# Altium PCB board.PcbDoc (part 1 of 3)
Units mm, origin at the board's own origin, x right, y up, seen from the top; angles counter-clockwise.
Board outline 86 x 120 mm, 4 copper layers (Top Layer, Signal Layer 1, Signal Layer 2, Bottom Layer), stack 1.571 mm thick; 144 components, 93 nets, 930 pads, 372 vias.
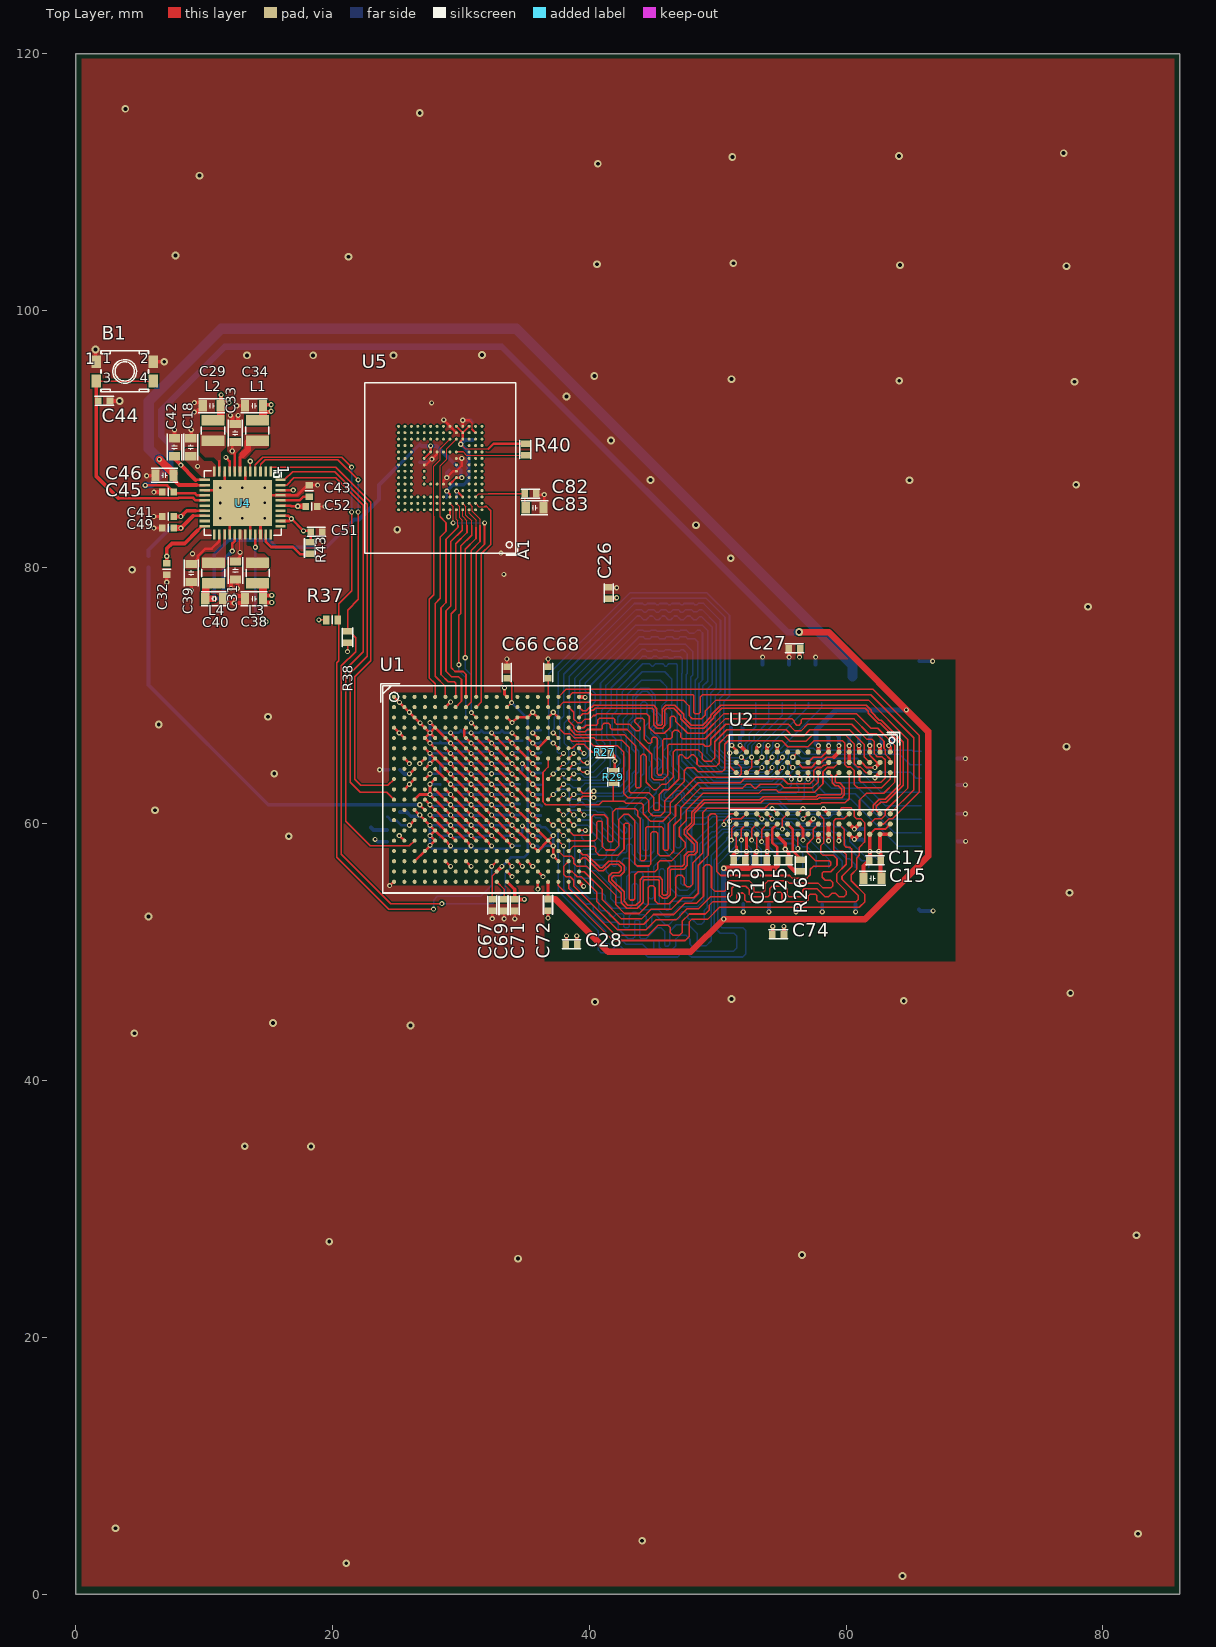
[diagram p0: Top Layer view]
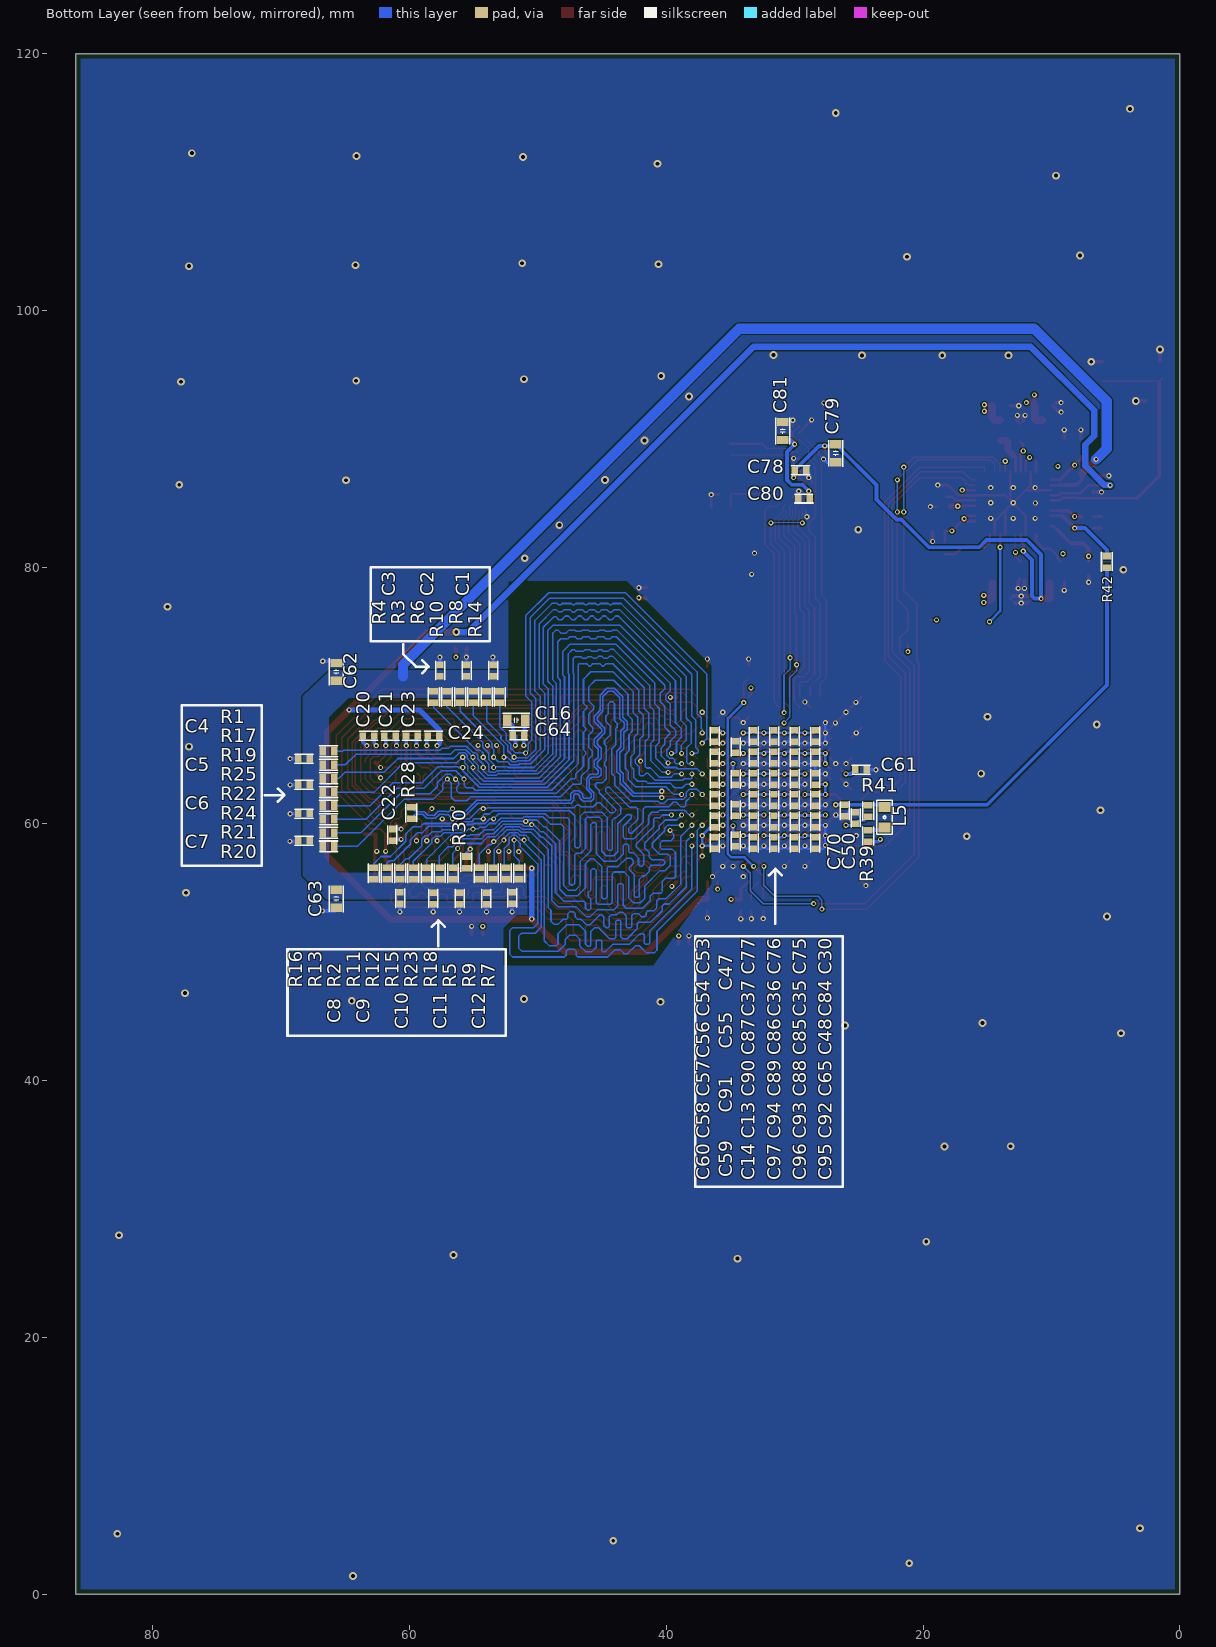
[diagram p1: Bottom Layer view, seen from below]
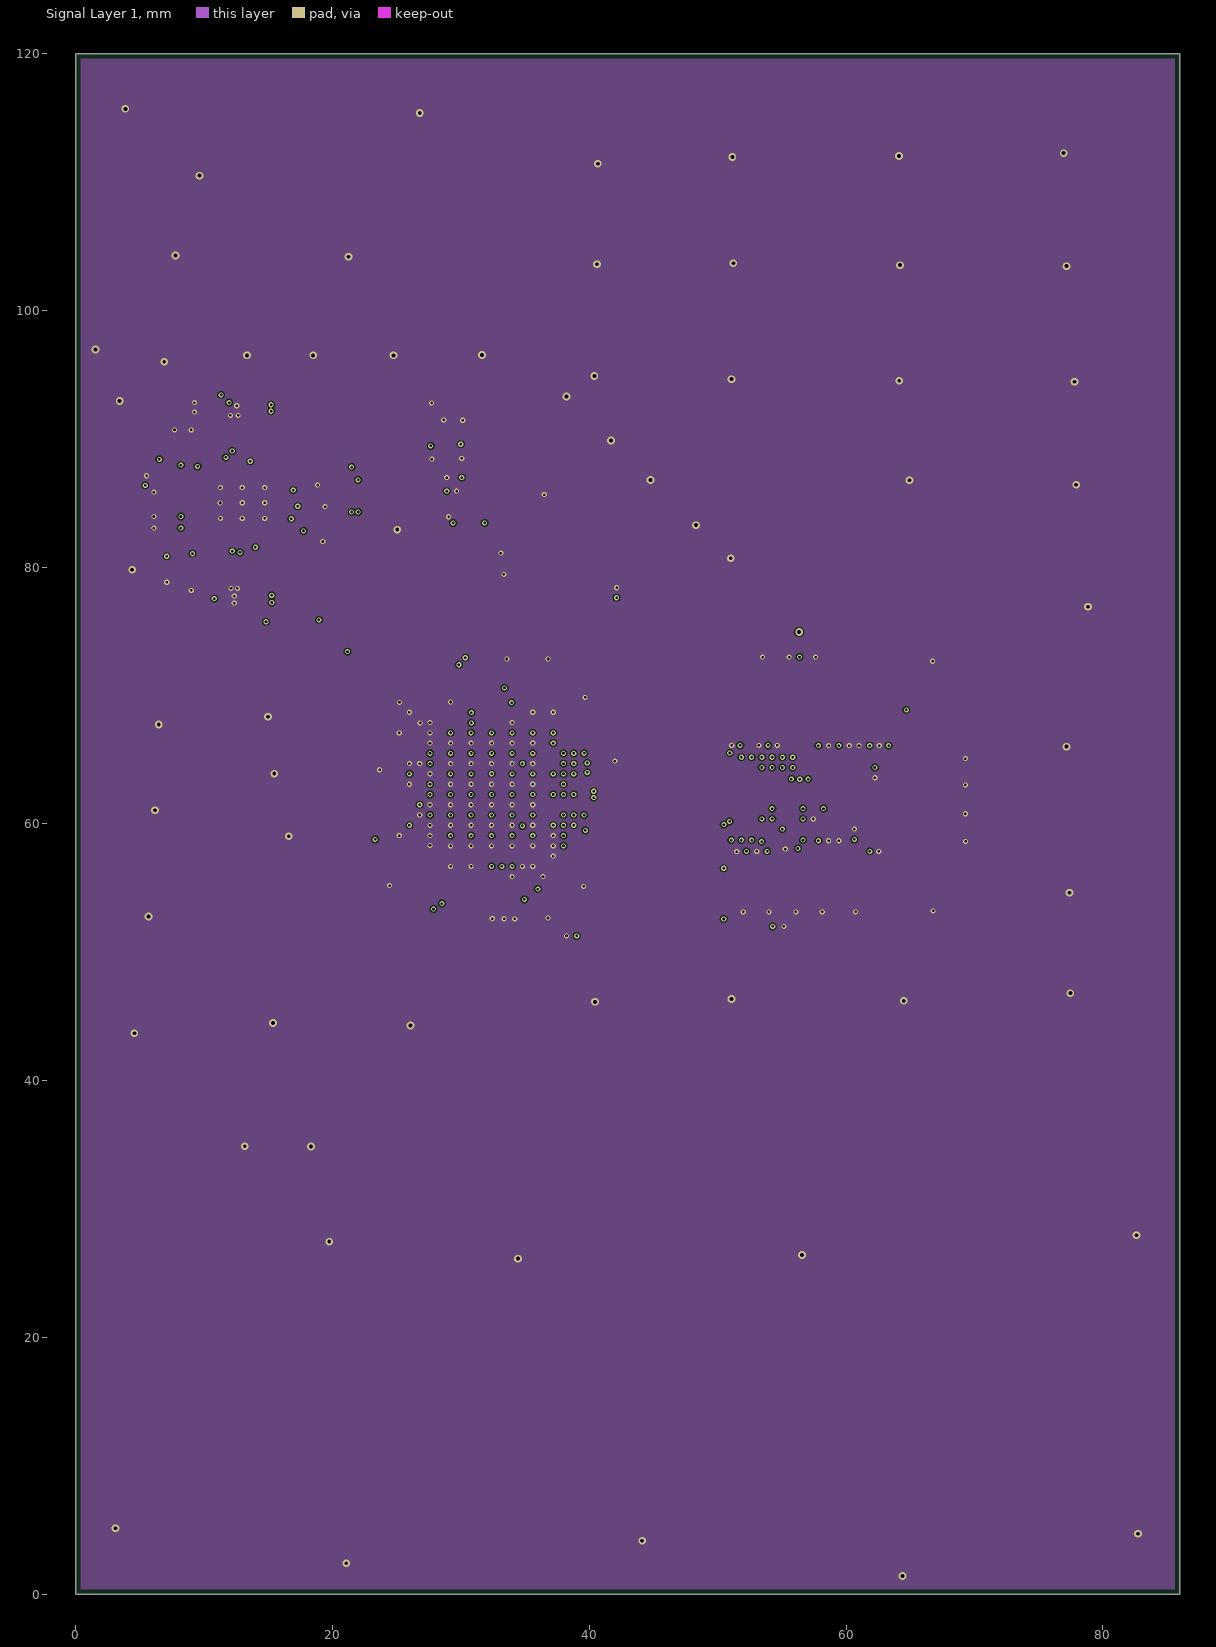
[diagram p2: Signal Layer 1]
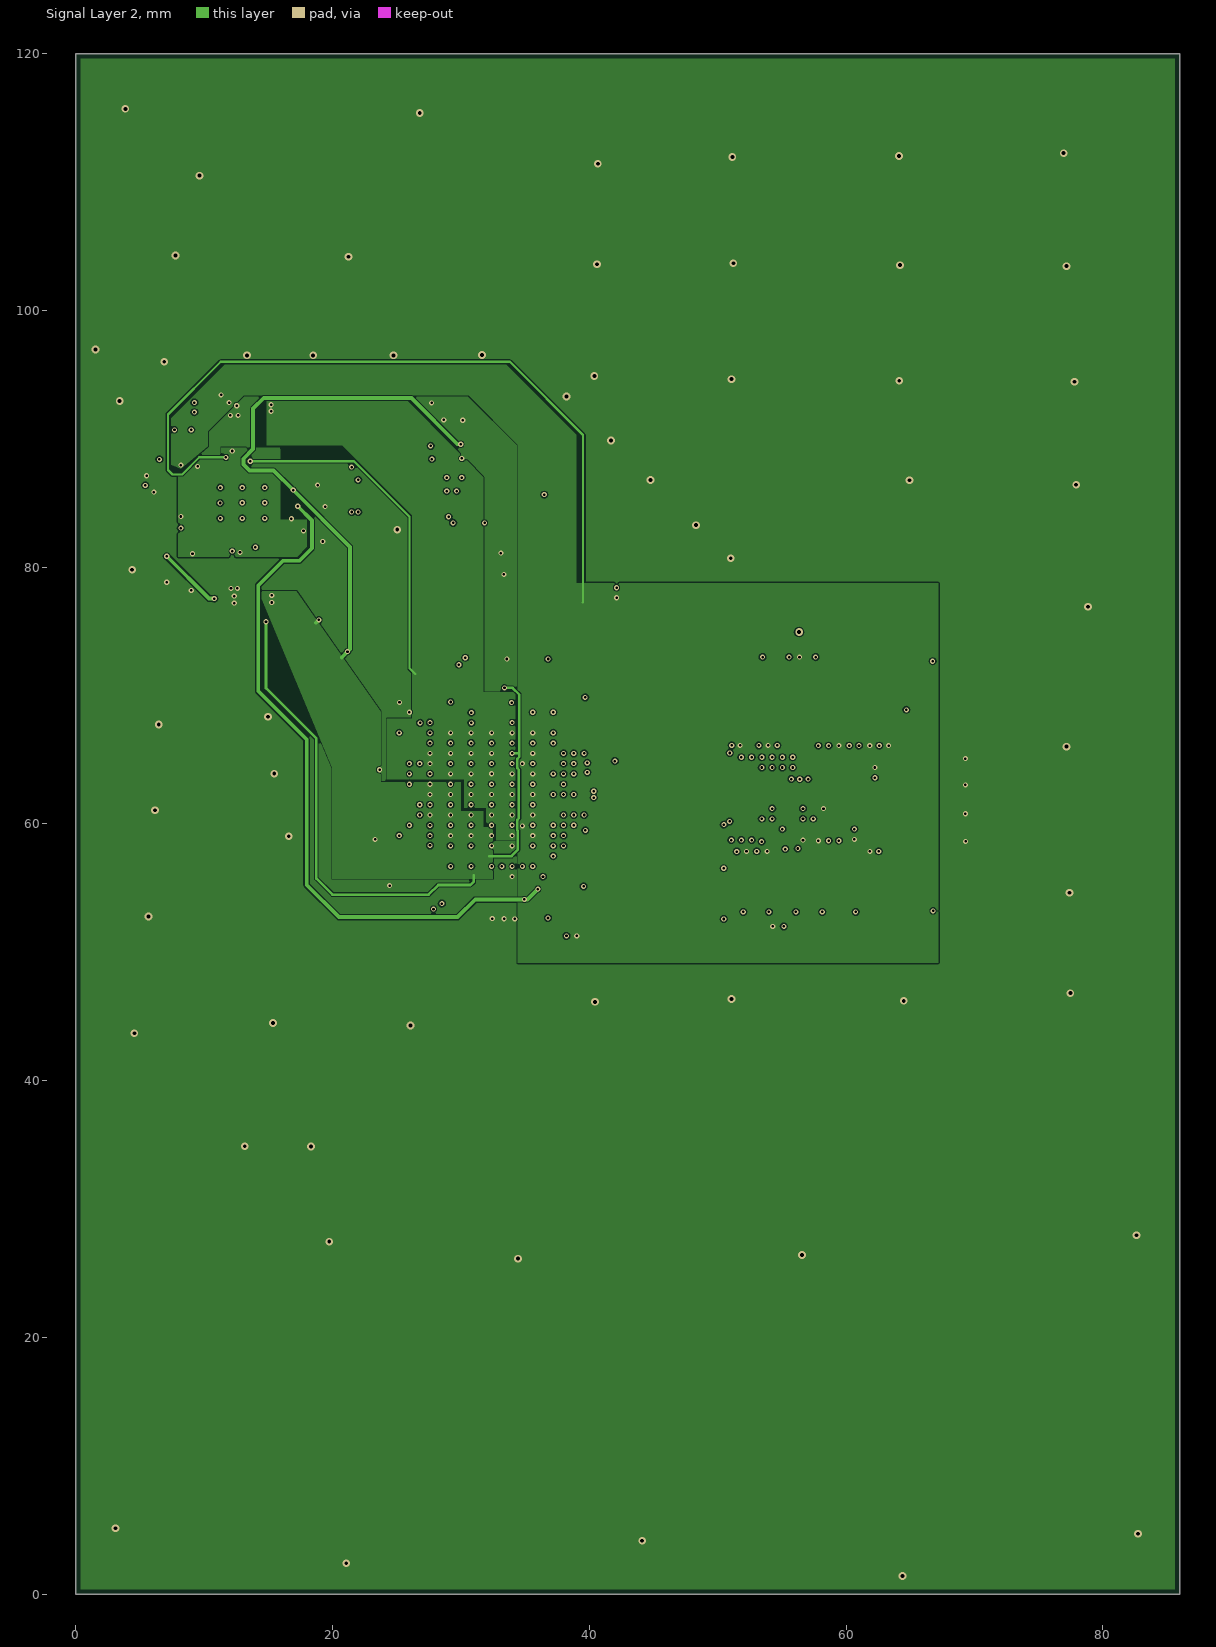
[diagram p3: Signal Layer 2]
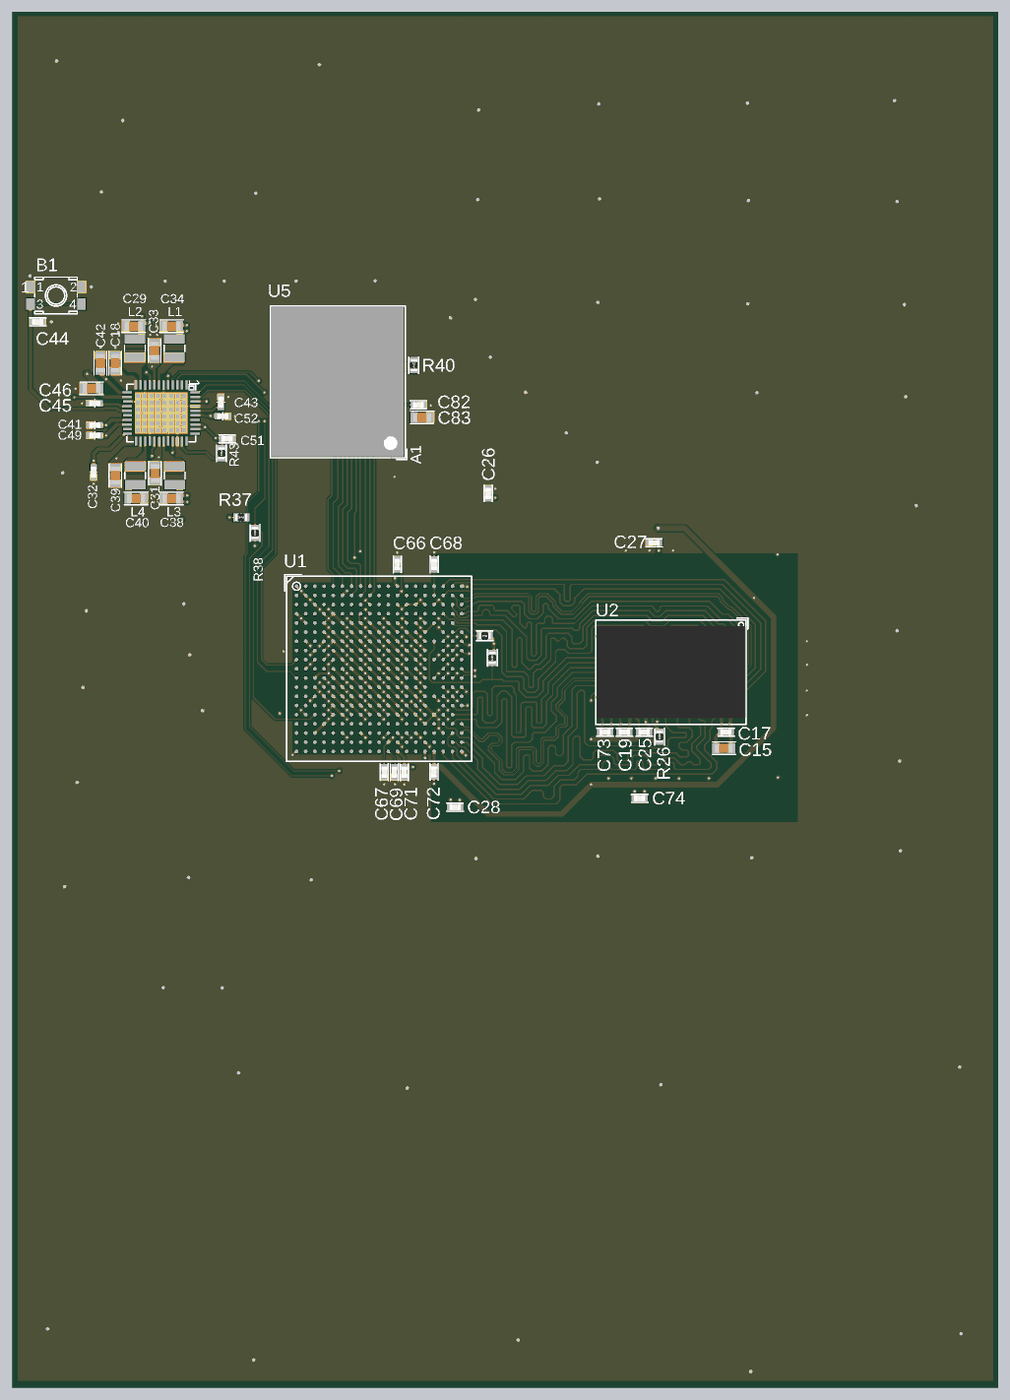
[diagram p6: 3D render of the assembled board from above, using the file's embedded part models]
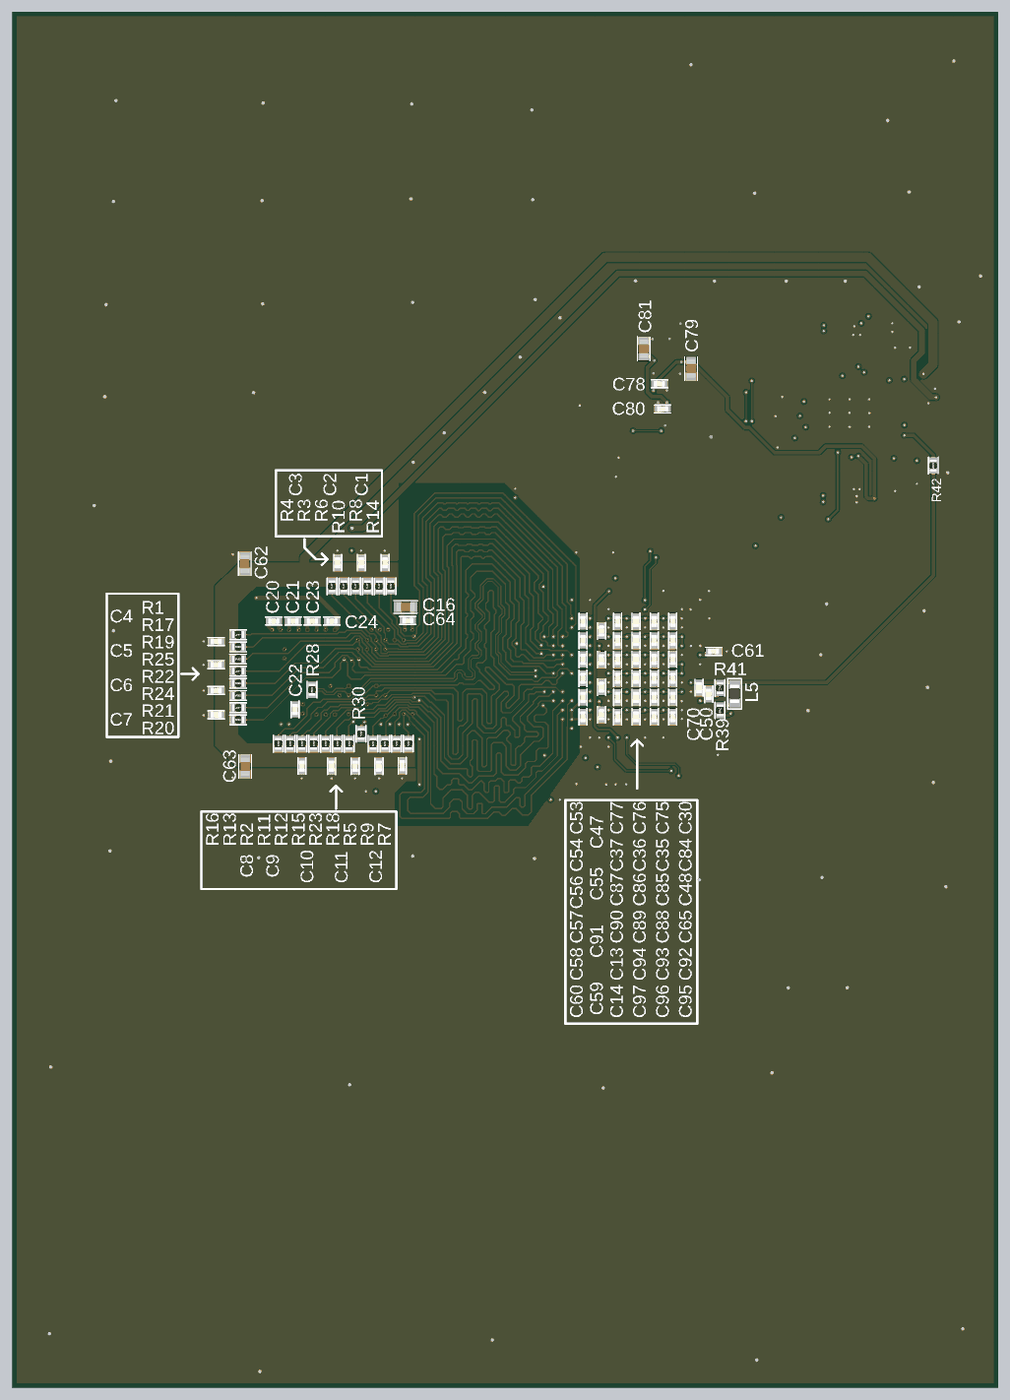
[diagram p7: 3D render of the assembled board from below, using the file's embedded part models]

## Layer stack, top to bottom
Top Solder: solder mask 0.0203, Solder Resist, Dk 3.5
Top Layer: signal copper 0.037
Dielectric 1: core 0.0986, FR-4, Dk 4.1
Signal Layer 1: signal copper 0.035
Dielectric 2: prepreg 1.23, FR-4, Dk 4.25
Signal Layer 2: signal copper 0.035
Dielectric 3: core 0.0986, FR-4, Dk 4.1
Bottom Layer: signal copper 0.037
Bottom Solder: solder mask 0.0203, Solder Resist, Dk 3.5

## Board outline
0,0 0,120 86,120 86,0

## Design rules (kind name [scope] priority, off if disabled: settings)
BoardOutlineClearance [All] p1: gap=0.4 ignorepadtopadclearanceinfootprint=FALSE
Clearance diff [InNetClass('diff')] p1: gap=0.1 ignorepadtopadclearanceinfootprint=FALSE except(0: Arc-Hole Track-Hole SMDPad-Hole THPad-Hole Via-Hole Fill-Hole Poly-Hole Region-Hole Text-Hole; 0.08: Track-SMDPad; 0.13: Track-Track; 0.15: Arc-Fill Track-Fill SMDPad-Fill THPad-Fill Via-Fill Fill-Fill; 0.2: Arc-THPad SMDPad-SMDPad SMDPad-THPad THPad-THPad)
Clearance [InNetClass('All Nets')] p2: gap=0.1 ignorepadtopadclearanceinfootprint=FALSE except(0: Arc-Hole Track-Hole SMDPad-Hole THPad-Hole Via-Hole Fill-Hole Poly-Hole Region-Hole Text-Hole; 0.09: Track-SMDPad; 0.15: Arc-Fill Track-Fill SMDPad-Fill THPad-Fill Via-Fill Fill-Fill)
ComponentClearance [All] p1 off: gap=0.025 collisioncheckmode=3 verticalgap=2540 showdistances=TRUE
DiffPairsRouting [All] p1: maxlimit=0.13 minlimit=0.13 mostfreqgap=0.13 toplayer_minwidth=0.09 toplayer_maxwidth=0.13 toplayer_prefwidth=0.1 midlayer1_minwidth=0.09 midlayer1_maxwidth=0.13 midlayer1_prefwidth=0.1 midlayer2_minwidth=0.09 midlayer2_maxwidth=0.13 midlayer2_prefwidth=0.1 bottomlayer_minwidth=0.09 bottomlayer_maxwidth=0.13 bottomlayer_prefwidth=0.1 maxuncoupledlength=0.5
FanoutControl Fanout_BGA [IsBGA] p1: bgadir=Out bgaviamode=Closest fanoutstyle=Auto fanoutdirection=Alternating viagrid=0.025 // Fanout_BGA (Default Rule)
FanoutControl Fanout_LCC [IsLCC] p2: bgadir=Out bgaviamode=Closest fanoutstyle=Auto fanoutdirection=Alternating viagrid=0.025 // Fanout_LCC (Default Rule)
FanoutControl Fanout_SOIC [IsSOIC] p3: bgadir=Out bgaviamode=Closest fanoutstyle=Auto fanoutdirection=Alternating viagrid=0.025 // Fanout_SOIC (Default Rule)
FanoutControl Fanout_Small [(CompPinCount < 5)] p4: bgadir=Out bgaviamode=Closest fanoutstyle=Auto fanoutdirection=OutThenIn viagrid=0.025 // Fanout_Small (Default Rule)
FanoutControl Fanout_Default [All] p5: bgadir=Out bgaviamode=Closest fanoutstyle=Auto fanoutdirection=Alternating viagrid=0.025 // Fanout_Default (Default Rule)
Height [All] p1 off: minheight=0 maxheight=100 prefheight=0.5
HoleSize [All] p1: absolutevalues=TRUE maxlimit=10 minlimit=0.15 maxpercent=80.000 minpercent=20.000
HoleToHoleClearance [All] p1: gap=0.25 allowstackedmicrovias=TRUE
Length Length_SDMMC1 [InNetClass('NETC_SDMMC1')] p1: maxlimit=86 minlimit=81
MinimumSolderMaskSliver [All] p1: minsoldermaskwidth=0
PlaneClearance [All] p1: clearance=0.6
PlaneConnect [All] p1: planeconnectstyle=Direct reliefexpansion=0.508 reliefentries=4 reliefconductorwidth=0.254 reliefairgap=0.254
PolygonConnect [All] p1: connectstyle=Direct reliefconductorwidth=0.254 reliefentries=4 polygonreliefangle="90 Angle" airgapwidth=0.254
RoomDefinition U_STM32_MPU_IOs [InComponentClass('U_STM32_MPU_IOs')] p1 off: confinementstyle=ConfineIn formatcopy=TRUE lockcomponents=FALSE outline 104.55,11.05 155.35,11.05 155.35,36.45 104.55,36.45
RoomDefinition U_Power_MPU [InComponentClass('U_Power_MPU')] p2 off: confinementstyle=ConfineIn formatcopy=TRUE lockcomponents=FALSE outline 87.674,18.025 101.45,18.025 101.45,24 87.674,24
RoomDefinition U_eMMC [InComponentClass('U_eMMC')] p3 off: confinementstyle=ConfineIn formatcopy=TRUE lockcomponents=FALSE outline 87.122,1.416 129.449,1.416 129.449,15.666 87.122,15.666
RoomDefinition U_1DDR3L_16bits [InComponentClass('U_1DDR3L_16bits')] p4 off: confinementstyle=ConfineIn formatcopy=TRUE lockcomponents=FALSE outline 92.5,18.4 143.3,18.4 143.3,43.8 92.5,43.8
RoomDefinition U_Power_PMIC [InComponentClass('U_Power_PMIC')] p5 off: confinementstyle=ConfineIn formatcopy=TRUE lockcomponents=FALSE outline 87.122,8.666 203.578,8.666 203.578,17.666 87.122,17.666
RoutingVias RoutingVias_GND [InNetClass('GND')] p1: holewidth=0.3 width=0.6 viastyle="Through Hole" minholewidth=0.2 minwidth=0.4 maxholewidth=0.3 maxwidth=0.6
RoutingVias RoutingVias_ALIMS [InNetClass('ALIMS')] p2: holewidth=0.3 width=0.6 viastyle="Through Hole" minholewidth=0.2 minwidth=0.4 maxholewidth=0.3 maxwidth=0.6
RoutingVias [All] p3: holewidth=0.2 width=0.4 viastyle="Through Hole" minholewidth=0.2 minwidth=0.4 maxholewidth=0.3 maxwidth=0.6
SilkToSilkClearance [All] p1: silktosilkclearance=0
SilkToSolderMaskClearance [IsPad] p1: minsilkscreentomaskgap=0 clearancetoexposedcopper=TRUE
SolderMaskExpansion [All] p1: expansion=0.05 istentingtop=FALSE
Width VDD_DDR [InNet('VDD_DDR')] p1: maxlimit=0.3 minlimit=0.1 preferedwidth=0.175
Width Width_VCORE [InNet('VDD_CORE')] p2: maxlimit=0.2 minlimit=0.175 preferedwidth=0.175
Width Width_gnd [InNet('GND')] p3: maxlimit=0.3 minlimit=0.1 preferedwidth=0.175
Width [All] p4: maxlimit=0.5 minlimit=0.09 preferedwidth=0.12 minimp=50.000000 maximp=50.000000 favimp=50.000000
15 further rules are at their usual default settings.

## Classes and differential pairs
from-to class ddr_addr_ctrl: "DDR_A0 (U1-H18 : U2-N3)" "DDR_A1 (U2-P7 : U1-M17)" "DDR_A2 (U1-G18 : U2-P3)" "DDR_A3 (U1-F19 : U2-N2)" "DDR_A4 (U2-P8 : U1-P17)" "DDR_A5 (U1-H17 : U2-P2)" "DDR_A6 (U1-N16 : U2-R8)" "DDR_A7 (U2-R2 : U1-E17)" "DDR_A8 (U1-R17 : U2-T8)" "DDR_A9 (U2-R3 : U1-G17)" "DDR_A10 (U1-M19 : U2-L7)" "DDR_A11 (U2-R7 : U1-M18)" "DDR_A12 (U1-L17 : U2-N7)" "DDR_A13 (U1-F17 : U2-T3)" "DDR_A14 (U2-T7 : U1-N18)" "DDR_A15 (U2-M7 : U1-L16)" "DDR_BA0 (U2-M2 : U1-G19)" "DDR_BA1 (U1-N17 : U2-N8)" "DDR_BA2 (U2-M3 : U1-J16)" "DDR_CASN (U1-K17 : U2-K3)" "DDR_CKE (U2-K9 : U1-P19)" "DDR_CLK_N (U2-K7 : U1-K19)" "DDR_CLK_P (U2-J7 : U1-L19)" "DDR_CSN (U1-J18 : U2-L2)" "DDR_ODT (U1-H19 : U2-K1)" "DDR_RASN (U1-L18 : U2-J3)" "DDR_WEN (U1-J17 : U2-L3)"
from-to class DDR_DQ: "DDR_DQ0 (U2-B8 : U1-A17)" "DDR_DQ1 (U2-A7 : U1-A18)" "DDR_DQ2 (U1-D18 : U2-C2)" "DDR_DQ3 (U1-B17 : U2-C8)" "DDR_DQ4 (U2-A3 : U1-E18)" "DDR_DQ5 (U1-D17 : U2-C3)" "DDR_DQ6 (U2-A2 : U1-D19)" "DDR_DQ7 (U1-B18 : U2-D7)" "DDR_DQ8 (U1-P18 : U2-G2)" "DDR_DQ9 (U2-E3 : U1-T17)" "DDR_DQ10 (U1-R18 : U2-H3)" "DDR_DQ11 (U2-H8 : U1-V19)" "DDR_DQ12 (U1-W18 : U2-F8)" "DDR_DQ13 (U2-F2 : U1-T18)" "DDR_DQ14 (U1-V18 : U2-H7)" "DDR_DQ15 (U2-F7 : U1-W17)" "DDR_DQM0 (U1-C18 : U2-D3)" "DDR_DQM1 (U2-E7 : U1-U18)" "DDR_DQS0_N (U1-B19 : U2-B7)" "DDR_DQS0_P (U2-C7 : U1-C19)" "DDR_DQS1_N (U1-T19 : U2-G3)" "DDR_DQS1_P (U2-F3 : U1-U19)"
differential pair class DIFF_CLK: DDR_CLK
differential pair class DIFF_DQS1: DDR_DQS1
differential pair class DIFF_DQS0: DDR_DQS0
polygon class POLY_DIRECT_ALL: NETC906_2_L01_P192
component class U_1DDR3L_16bits: C1 C2 C3 C4 C5 C6 C7 C8 C9 C10 C11 C12 C15 C16 C17 C19 C20 C21 C22 C23 C24 C25 C26 C27 C28 C62 C63 C64 C73 C74 R1 R2 R3 R4 R5 R6 R7 R8 R9 R10 R11 R12 R13 R14 R15 R16 R17 R18 R19 R20 R21 R22 R23 R24 R25 R26 R28 R29 R30 U2
component class U_Power_MPU: C13 C14 C30 C35 C36 C37 C47 C48 C50 C53 C54 C55 C56 C57 C58 C59 C60 C61 C65 C66 C67 C68 C69 C70 C71 C75 C76 C77 C84 C85 C86 C87 C88 C89 C90 C91 C92 C93 C94 C95 C96 C97 L5 R39 R41 R42
component class U_Power_PMIC: B1 C18 C29 C31 C32 C33 C34 C38 C39 C40 C41 C42 C43 C44 C45 C46 C49 C51 C52 L1 L2 L3 L4 R43 U4
component class U_eMMC: C78 C79 C80 C81 C82 C83 R40 U5
component class U_STM32_MPU_IOs: C72 R27 R37 R38 U1
net class eMMC_SDIO2_D[0..7]: eMMC_SDIO2_D0 eMMC_SDIO2_D1 eMMC_SDIO2_D2 eMMC_SDIO2_D3 eMMC_SDIO2_D4 eMMC_SDIO2_D5 eMMC_SDIO2_D6 eMMC_SDIO2_D7
differential pair DDR_DQS0: +DDR_DQS0_P -DDR_DQS0_N
differential pair DDR_DQS1: +DDR_DQS1_P -DDR_DQS1_N

## Components (designator, comment, footprint, x,y, rotation, side; value= is the part's Value field where it differs from the comment)
B1 "" SWI_JIUBABA_C-TS-02H-2-5-B-V-T_R_BLUE 3.825,95.25 r0 top value=SW-PUSH-TS-02H-Blue
C1 "" C0402#1 53.48,71.95 r270 bottom value=100nF
C2 "" C0402#1 55.55,71.95 r270 bottom value=100nF
C3 "" C0402#1 57.61,71.95 r270 bottom value=100nF
C4 "" C0402#1 68.21,65.08 r180 bottom value=100nF
C5 "" C0402#1 68.21,63.06 r180 bottom value=100nF
C6 "" C0402#1 68.21,60.81 r180 bottom value=100nF
C7 "" C0402#1 68.21,58.69 r180 bottom value=100nF
C8 "" C0402#1 60.73,54.22 r90 bottom value=100nF
C9 "" C0402#1 58.14,54.21 r90 bottom value=100nF
C10 "" C0402#1 56.09,54.21 r90 bottom value=100nF
C11 "" C0402#1 54.01,54.21 r90 bottom value=100nF
C12 "" C0402#1 51.99,54.25 r90 bottom value=100nF
C13 "" C0402#1 33.2,60.21 r90 bottom value=1uF
C14 "" C0402#1 33.2,58.52 r90 bottom value=1uF
C15 "" C0603#1 62.06,55.78 r180 top value=10uF
C16 "" C0603#1 51.69,68.09 r0 bottom value=10uF
C17 "" C0402#1 62.25,57.17 r180 top value=100nF
C18 "" C0603#2 8.975,89.35 r270 bottom value=10uF
C19 "" C0402#1 53.39,57.17 r0 top value=100nF
C20 "" C0402#1 63.19,66.86 r0 bottom value=100nF
C21 "" C0402#1 61.51,66.86 r0 bottom value=100nF
C22 "" C0402#1 61.33,59.16 r90 bottom value=100nF
C23 "" C0402#1 59.82,66.86 r180 bottom value=100nF
C24 "" C0402#1 58.12,66.86 r180 bottom value=100nF
C25 "" C0402#1 55.11,57.17 r180 top value=100nF
C26 "" C0402#1 41.52,78 r270 top value=100nF
C27 "" C0402#1 55.98,73.68 r0 top value=100nF
C28 "" C0402#1 38.63,50.63 r0 top value=100nF
C29 "" C0603#2 10.6,92.575 r0 bottom value=22uF
C30 "" C0402#1 28.4,66.84 r90 bottom value=1uF
C31 "" C0603#2 12.45,79.75 r90 bottom value=10uF
C32 "" C0402#2 7.1,79.85 r90 bottom value=1uF
C33 "" C0603#2 12.425,90.45 r270 bottom value=10uF
C34 "" C0603#2 13.9,92.575 r0 bottom value=22uF
C35 "" C0402#1 30,65.17 r90 bottom value=1uF
C36 "" C0402#1 31.6,65.17 r90 bottom value=1uF
C37 "" C0402#1 33.2,65.17 r90 bottom value=1uF
C38 "" C0603#2 13.9,77.55 r0 bottom value=22uF
C39 "" C0603#2 9,79.55 r90 bottom value=10uF
C40 "" C0603#2 10.8,77.55 r180 bottom value=22uF
C41 "" C0402#2 7.2,83.95 r0 bottom value=1uF
C42 "" C0603#2 7.7,89.35 r270 bottom value=10uF
C43 "" C0402#2 18.2,85.95 r270 bottom value=4.7uF
C44 "" C0402#1 2.225,92.95 r180 top value=10nF
C45 "" C0402#1 7.2,85.85 r0 top value=1uF
C46 "" C0603#1 6.925,87.15 r0 top value=10uF
C47 "" C0402#1 34.6,66 r270 bottom value=1uF
C48 "" C0402#1 28.4,63.52 r270 bottom value=1uF
C49 "" C0402#2 7.2,83.05 r0 bottom value=4.7uF
C50 "" C0402#1 25.25,60.475 r270 bottom value=1uF
C51 "" C0402#1 18.75,82.75 r0 top value=4.7uF
C52 "" C0402#1 18.375,84.725 r180 top value=4.7uF
C53 "" C0402#1 36.22,66.84 r90 bottom value=1uF
C54 "" C0402#1 36.22,65.17 r90 bottom value=1nF
C55 "" C0402#1 34.6,63.5 r90 bottom value=1uF
C56 "" C0402#1 36.22,63.52 r90 bottom value=1uF
C57 "" C0402#1 36.22,61.87 r90 bottom value=1nF
C58 "" C0402#1 36.22,60.21 r90 bottom value=1uF
C59 "" C0402#1 34.6,58.7 r90 bottom value=1uF
C60 "" C0402#1 36.22,58.52 r90 bottom value=1uF
C61 "" C0402#1 24.825,64.225 r0 bottom value=100nF
C62 "" C0603#1 65.71,71.85 r270 bottom value=22uF
C63 "" C0603#1 65.69,54.18 r90 bottom value=22uF
C64 "" C0402#1 51.5,66.91 r0 bottom value=100nF
C65 "" C0402#1 28.4,61.87 r90 bottom value=1uF
C66 "" C0402#1 33.59,71.8 r270 top value=100nF
C67 "Capacitor" C0402#1 32.45,53.69 r90 top value=2.2uF
C68 "Capacitor" C0402#1 36.8,71.8 r270 top value=2.2uF
C69 "Capacitor" C0402#1 33.325,53.675 r90 top value=2.2uF
C70 "" C0402#1 26.1,61.05 r90 bottom value=1uF
C71 "" C0402#1 34.2,53.675 r90 top value=100nF
C72 "" C0402#1 36.79,53.71 r90 top value=100nF
C73 "" C0402#1 51.7,57.17 r0 top value=100nF
C74 "" C0402#1 54.72,51.4 r180 top value=100nF
C75 "" C0402#1 30,66.84 r90 bottom value=1uF
C76 "" C0402#1 31.6,66.84 r90 bottom value=1uF
C77 "" C0402#1 33.2,66.84 r90 bottom value=1uF
C78 "" C0402#1 29.55,87.55 r0 bottom value=100nF
C79 "" C0603#1 26.8,88.875 r90 bottom value=2.2uF
C80 "" C0402#1 29.275,85.35 r180 bottom value=100nF
C81 "" C0603#1 30.925,90.6 r270 bottom value=2.2uF
C82 "" C0402#1 35.425,85.725 r180 top value=100nF
C83 "" C0603#1 35.75,84.625 r180 top value=2.2uF
C84 "" C0402#1 28.4,65.17 r90 bottom value=1uF
C85 "" C0402#1 30,63.52 r90 bottom value=1uF
C86 "" C0402#1 31.6,63.52 r90 bottom value=1uF
C87 "" C0402#1 33.2,63.52 r90 bottom value=1uF
C88 "" C0402#1 30,61.87 r90 bottom value=1uF
C89 "" C0402#1 31.6,61.87 r90 bottom value=1uF
C90 "" C0402#1 33.2,61.87 r90 bottom value=1uF
C91 "" C0402#1 34.6,61.1 r270 bottom value=1uF
C92 "" C0402#1 28.4,60.21 r90 bottom value=1uF
C93 "" C0402#1 30,60.21 r90 bottom value=1uF
C94 "" C0402#1 31.6,60.21 r90 bottom value=1uF
C95 "" C0402#1 28.4,58.52 r90 bottom value=1uF
C96 "" C0402#1 30,58.52 r90 bottom value=1uF
C97 "" C0402#1 31.6,58.52 r90 bottom value=1uF
L1 "" IND_MURATA_DFE201612P 14.15,90.65 r90 bottom value=DFE201612P-1R0M
L2 "" IND_MURATA_DFE201612P 10.7,90.65 r90 bottom value=DFE201612P-1R0M
L3 "" IND_MURATA_DFE201612P 14.175,79.55 r270 bottom value=DFE201612P-1R0M
L4 "" IND_MURATA_DFE201612P 10.725,79.55 r270 bottom value=DFE201612P-1R0M
L5 "" L0603_H0P8 23,60.525 r90 bottom value=LQM18FN4R7M00D
R1 "" R0402#1 66.3,65.67 r0 bottom value=56R
R2 "" R0402#1 60.73,56.16 r270 bottom value=56R
R3 "" R0402#1 57.08,69.9 r90 bottom value=56R
R4 "" R0402#1 58.11,69.9 r90 bottom value=56R
R5 "" R0402#1 53.5,56.16 r270 bottom value=56R
R6 "" R0402#1 56.05,69.9 r90 bottom value=56R
R7 "" R0402#1 51.45,56.16 r270 bottom value=56R
R8 "" R0402#1 53.99,69.9 r90 bottom value=56R
R9 "" R0402#1 52.48,56.16 r270 bottom value=56R
R10 "" R0402#1 55.02,69.9 r90 bottom value=56R
R11 "" R0402#1 59.7,56.16 r270 bottom value=56R
R12 "" R0402#1 58.67,56.16 r270 bottom value=56R
R13 "" R0402#1 61.76,56.16 r270 bottom value=56R
R14 "" R0402#1 52.97,69.9 r90 bottom value=56R
R15 "" R0402#1 57.64,56.16 r270 bottom value=56R
R16 "" R0402#1 62.79,56.16 r270 bottom value=56R
R17 "" R0402#1 66.3,64.61 r0 bottom value=56R
R18 "" R0402#1 54.53,56.16 r270 bottom value=56R
R19 "" R0402#1 66.3,63.55 r0 bottom value=56R
R20 "" R0402#1 66.3,58.25 r0 bottom value=56R
R21 "" R0402#1 66.3,59.31 r0 bottom value=56R
R22 "" R0402#1 66.3,61.43 r0 bottom value=56R
R23 "" R0402#1 56.61,56.16 r270 bottom value=56R
R24 "" R0402#1 66.3,60.37 r0 bottom value=56R
R25 "" R0402#1 66.3,62.49 r0 bottom value=56R
R26 "" R0402#1 56.46,56.78 r90 top value=240R
R27 "" R0402#1 41.22,65.58 r0 top value=240R
R28 "" R0402#1 59.85,60.87 r270 bottom value=100R
R29 "" R0402#1 41.875,63.65 r270 top value=10K
R30 "" R0402#1 55.57,57.02 r270 bottom value=10K
R37 "" R0402#1 19.975,75.9 r0 top value=1K5
R38 "" R0402#1 21.175,74.55 r90 top value=1K5
R39 "" R0402#1 24.275,59.075 r90 bottom value=0R
R40 "" R0402#1 35.025,89.175 r90 top value=10K
R41 "" R0402#1 24.275,61.025 r270 bottom value=0R
R42 "" R0402#1 5.675,80.425 r270 bottom value=0R
R43 "" R0402#2 18.25,81.5 r90 bottom value=47K
U1 "STM32MP157CAB3" ICC_LFBGA354_16X16_STM32MP157CAB3_P080 32,62.7 r0 top locked
U2 "" ICC_VFBGA96_9x13_P080 57.45,62.4 r270 top locked value=NT5CC256M16ER-EK
U4 "" ICC_WFQFN44-EPAD_5X6_P040 13,85 r270 top value=STPMIC1APQR
U5 "" ICC_P-WFBGA153_13X11P5_P050 28.4,87.725 r90 top locked value=THGBMDG5D1LBAIL

## Footprints (in the part's own frame and the unit in brackets; to place one, negate y for a bottom-side part, rotate by r counter-clockwise, add the part's x,y. Pads: shape width x height; smd on the part's side, far side on the other; paste and mask are expansions set on the pad)
C0402#1 [mm]
  rect 0.51x0.56 smd mask+0.05: 1(-0.45,0) 2(0.45,0)
  silkscreen extent -0.72,-0.35 0.72,0.35, body extent -0.5,-0.3 0.5,0.3, height 0.4
C0402#2 [mm]
  rect 0.51x0.56 smd far side mask+0.05: 1(-0.45,0) 2(0.45,0)
  body extent -0.5,-0.3 0.5,0.3, height 0.4
C0603#1 [mm]
  rect 0.64x0.89 smd mask+0.05: 1(-0.7,0) 2(0.7,0)
  silkscreen extent -1.05,-0.55 1.02,0.55, body extent -0.9,-0.5 0.9,0.5, height 1.4
C0603#2 [mm]
  rect 0.64x0.89 smd far side mask+0.05: 1(-0.7,0) 2(0.7,0)
  body extent -0.9,-0.5 0.9,0.5, height 1.4
ICC_LFBGA354_16X16_STM32MP157CAB3_P080 [mm] "MCD-01805"
  round 0.32 smd paste+0 mask+0.05: A1(-7.2,7.2) A2(-6.4,7.2) A3(-5.6,7.2) A4(-4.8,7.2) A5(-4,7.2) A6(-3.2,7.2) A7(-2.4,7.2) A8(-1.6,7.2) A9(-0.8,7.2) A10(0,7.2) A11(0.8,7.2) A12(1.6,7.2) A13(2.4,7.2) A14(3.2,7.2) A15(4,7.2) A16(4.8,7.2) A17(5.6,7.2) A18(6.4,7.2) A19(7.2,7.2) B1(-7.2,6.4) B2(-6.4,6.4) B3(-5.6,6.4) B4(-4.8,6.4) B5(-4,6.4) B6(-3.2,6.4) B7(-2.4,6.4) B8(-1.6,6.4) B9(-0.8,6.4) B10(0,6.4) B11(0.8,6.4) B12(1.6,6.4) B13(2.4,6.4) B14(3.2,6.4) B15(4,6.4) B16(4.8,6.4) B17(5.6,6.4) B18(6.4,6.4) B19(7.2,6.4) C1(-7.2,5.6) C2(-6.4,5.6) C3(-5.6,5.6) C4(-4.8,5.6) C5(-4,5.6) C6(-3.2,5.6) C7(-2.4,5.6) C8(-1.6,5.6) C9(-0.8,5.6) C10(0,5.6) C11(0.8,5.6) C12(1.6,5.6) C13(2.4,5.6) C14(3.2,5.6) C15(4,5.6) C16(4.8,5.6) C17(5.6,5.6) C18(6.4,5.6) C19(7.2,5.6) D1(-7.2,4.8) D2(-6.4,4.8) D3(-5.6,4.8) D4(-4.8,4.8) D5(-4,4.8) D6(-3.2,4.8) D7(-2.4,4.8) D8(-1.6,4.8) D9(-0.8,4.8) D10(0,4.8) D11(0.8,4.8) D12(1.6,4.8) D13(2.4,4.8) D14(3.2,4.8) D15(4,4.8) D16(4.8,4.8) D17(5.6,4.8) D18(6.4,4.8) D19(7.2,4.8) E1(-7.2,4) E2(-6.4,4) E3(-5.6,4) E4(-4.8,4) E5(-4,4) E6(-3.2,4) E7(-2.4,4) E8(-1.6,4) E9(-0.8,4) E10(0,4) E11(0.8,4) E12(1.6,4) E13(2.4,4) E14(3.2,4) E15(4,4) E16(4.8,4) E17(5.6,4) E18(6.4,4) F1(-7.2,3.2) F2(-6.4,3.2) F3(-5.6,3.2) F4(-4.8,3.2) F5(-4,3.2) F6(-3.2,3.2) F7(-2.4,3.2) F8(-1.6,3.2) F9(-0.8,3.2) F10(0,3.2) F11(0.8,3.2) F12(1.6,3.2) F13(2.4,3.2) F14(3.2,3.2) F15(4,3.2) F17(5.6,3.2) F18(6.4,3.2) F19(7.2,3.2) G1(-7.2,2.4) G2(-6.4,2.4) G3(-5.6,2.4) G4(-4.8,2.4) G5(-4,2.4) G6(-3.2,2.4) G7(-2.4,2.4) G8(-1.6,2.4) G9(-0.8,2.4) G10(0,2.4) G11(0.8,2.4) G12(1.6,2.4) G13(2.4,2.4) G14(3.2,2.4) G15(4,2.4) G16(4.8,2.4) G17(5.6,2.4) G18(6.4,2.4) G19(7.2,2.4) H1(-7.2,1.6) H2(-6.4,1.6) H3(-5.6,1.6) H4(-4.8,1.6) H5(-4,1.6) H6(-3.2,1.6) H7(-2.4,1.6) H8(-1.6,1.6) H9(-0.8,1.6) H10(0,1.6) H11(0.8,1.6) H12(1.6,1.6) H13(2.4,1.6) H14(3.2,1.6) H15(4,1.6) H17(5.6,1.6) H18(6.4,1.6) H19(7.2,1.6) J1(-7.2,0.8) J2(-6.4,0.8) J3(-5.6,0.8) J4(-4.8,0.8) J5(-4,0.8) J6(-3.2,0.8) J7(-2.4,0.8) J8(-1.6,0.8) J9(-0.8,0.8) J10(0,0.8) J11(0.8,0.8) J12(1.6,0.8) J13(2.4,0.8) J14(3.2,0.8) J15(4,0.8) J16(4.8,0.8) J17(5.6,0.8) J18(6.4,0.8) J19(7.2,0.8) K1(-7.2,0) K2(-6.4,0) K3(-5.6,0) K4(-4.8,0) K5(-4,0) K6(-3.2,0) K7(-2.4,0) K8(-1.6,0) K9(-0.8,0) K10(0,0) K11(0.8,0) K12(1.6,0) K13(2.4,0) K14(3.2,0) K15(4,0) K17(5.6,0) K18(6.4,0) K19(7.2,0) L1(-7.2,-0.8) L2(-6.4,-0.8) L3(-5.6,-0.8) L4(-4.8,-0.8) L5(-4,-0.8) L6(-3.2,-0.8) L7(-2.4,-0.8) L8(-1.6,-0.8) L9(-0.8,-0.8) L10(0,-0.8) L11(0.8,-0.8) L12(1.6,-0.8) L13(2.4,-0.8) L14(3.2,-0.8) L15(4,-0.8) L16(4.8,-0.8) L17(5.6,-0.8) L18(6.4,-0.8) L19(7.2,-0.8) M1(-7.2,-1.6) M2(-6.4,-1.6) M3(-5.6,-1.6) M4(-4.8,-1.6) M5(-4,-1.6) M6(-3.2,-1.6) M7(-2.4,-1.6) M8(-1.6,-1.6) M9(-0.8,-1.6) M10(0,-1.6) M11(0.8,-1.6) M12(1.6,-1.6) M13(2.4,-1.6) M14(3.2,-1.6) M15(4,-1.6) M17(5.6,-1.6) M18(6.4,-1.6) M19(7.2,-1.6) N1(-7.2,-2.4) N2(-6.4,-2.4) N3(-5.6,-2.4) N4(-4.8,-2.4) N5(-4,-2.4) N6(-3.2,-2.4) N7(-2.4,-2.4) N8(-1.6,-2.4) N9(-0.8,-2.4) N10(0,-2.4) N11(0.8,-2.4) N12(1.6,-2.4) N13(2.4,-2.4) N14(3.2,-2.4) N15(4,-2.4) N16(4.8,-2.4) N17(5.6,-2.4) N18(6.4,-2.4) N19(7.2,-2.4) P1(-7.2,-3.2) P2(-6.4,-3.2) P3(-5.6,-3.2) P4(-4.8,-3.2) P5(-4,-3.2) P6(-3.2,-3.2) P7(-2.4,-3.2) P8(-1.6,-3.2) P9(-0.8,-3.2) P10(0,-3.2) P11(0.8,-3.2) P12(1.6,-3.2) P13(2.4,-3.2) P14(3.2,-3.2) P15(4,-3.2) P17(5.6,-3.2) P18(6.4,-3.2) P19(7.2,-3.2) R1(-7.2,-4) R2(-6.4,-4) R3(-5.6,-4) R4(-4.8,-4) R5(-4,-4) R6(-3.2,-4) R7(-2.4,-4) R8(-1.6,-4) R9(-0.8,-4) R10(0,-4) R11(0.8,-4) R12(1.6,-4) R13(2.4,-4) R14(3.2,-4) R15(4,-4) R16(4.8,-4) R17(5.6,-4) R18(6.4,-4) T1(-7.2,-4.8) T2(-6.4,-4.8) T3(-5.6,-4.8) T4(-4.8,-4.8) T5(-4,-4.8) T6(-3.2,-4.8) T7(-2.4,-4.8) T8(-1.6,-4.8) T9(-0.8,-4.8) T10(0,-4.8) T11(0.8,-4.8) T12(1.6,-4.8) T13(2.4,-4.8) T14(3.2,-4.8) T15(4,-4.8) T16(4.8,-4.8) T17(5.6,-4.8) T18(6.4,-4.8) T19(7.2,-4.8) U1(-7.2,-5.6) U2(-6.4,-5.6) U3(-5.6,-5.6) U4(-4.8,-5.6) U5(-4,-5.6) U6(-3.2,-5.6) U7(-2.4,-5.6) U8(-1.6,-5.6) U9(-0.8,-5.6) U10(0,-5.6) U11(0.8,-5.6) U12(1.6,-5.6) U13(2.4,-5.6) U14(3.2,-5.6) U15(4,-5.6) U16(4.8,-5.6) U17(5.6,-5.6) U18(6.4,-5.6) U19(7.2,-5.6) V1(-7.2,-6.4) V2(-6.4,-6.4) V3(-5.6,-6.4) V4(-4.8,-6.4) V5(-4,-6.4) V6(-3.2,-6.4) V7(-2.4,-6.4) V8(-1.6,-6.4) V9(-0.8,-6.4) V10(0,-6.4) V11(0.8,-6.4) V12(1.6,-6.4) V13(2.4,-6.4) V14(3.2,-6.4) V15(4,-6.4) V16(4.8,-6.4) V17(5.6,-6.4) V18(6.4,-6.4) V19(7.2,-6.4) W1(-7.2,-7.2) W2(-6.4,-7.2) W3(-5.6,-7.2) W4(-4.8,-7.2) W5(-4,-7.2) W6(-3.2,-7.2) W7(-2.4,-7.2) W8(-1.6,-7.2) W9(-0.8,-7.2) W10(0,-7.2) W11(0.8,-7.2) W12(1.6,-7.2) W13(2.4,-7.2) W14(3.2,-7.2) W15(4,-7.2) W16(4.8,-7.2) W17(5.6,-7.2) W18(6.4,-7.2) W19(7.2,-7.2)
  silkscreen extent -8.23,-8.08 8.08,8.23, body extent -8.08,-8.08 8.08,8.08, height 1.3
ICC_P-WFBGA153_13X11P5_P050 [mm]
  round 0.23 smd mask+0.05: A1(-3.25,-3.25) A2(-3.25,-2.75) A3(-3.25,-2.25) A4(-3.25,-1.75) A5(-3.25,-1.25) A6(-3.25,-0.75) A7(-3.25,-0.25) A8(-3.25,0.25) A9(-3.25,0.75) A10(-3.25,1.25) A11(-3.25,1.75) A12(-3.25,2.25) A13(-3.25,2.75) A14(-3.25,3.25) B1(-2.75,-3.25) B2(-2.75,-2.75) B3(-2.75,-2.25) B4(-2.75,-1.75) B5(-2.75,-1.25) B6(-2.75,-0.75) B7(-2.75,-0.25) B8(-2.75,0.25) B9(-2.75,0.75) B10(-2.75,1.25) B11(-2.75,1.75) B12(-2.75,2.25) B13(-2.75,2.75) B14(-2.75,3.25) C1(-2.25,-3.25) C2(-2.25,-2.75) C3(-2.25,-2.25) C4(-2.25,-1.75) C5(-2.25,-1.25) C6(-2.25,-0.75) C7(-2.25,-0.25) C8(-2.25,0.25) C9(-2.25,0.75) C10(-2.25,1.25) C11(-2.25,1.75) C12(-2.25,2.25) C13(-2.25,2.75) C14(-2.25,3.25) D1(-1.75,-3.25) D2(-1.75,-2.75) D3(-1.75,-2.25) D4(-1.75,-1.75) D12(-1.75,2.25) D13(-1.75,2.75) D14(-1.75,3.25) E1(-1.25,-3.25) E2(-1.25,-2.75) E3(-1.25,-2.25) E5(-1.25,-1.25) E6(-1.25,-0.75) E7(-1.25,-0.25) E8(-1.25,0.25) E9(-1.25,0.75) E10(-1.25,1.25) E12(-1.25,2.25) E13(-1.25,2.75) E14(-1.25,3.25) F1(-0.75,-3.25) F2(-0.75,-2.75) F3(-0.75,-2.25) F5(-0.75,-1.25) F10(-0.75,1.25) F12(-0.75,2.25) F13(-0.75,2.75) F14(-0.75,3.25) G1(-0.25,-3.25) G2(-0.25,-2.75) G3(-0.25,-2.25) G5(-0.25,-1.25) G10(-0.25,1.25) G12(-0.25,2.25) G13(-0.25,2.75) G14(-0.25,3.25) H1(0.25,-3.25) H2(0.25,-2.75) H3(0.25,-2.25) H5(0.25,-1.25) H10(0.25,1.25) H12(0.25,2.25) H13(0.25,2.75) H14(0.25,3.25) J1(0.75,-3.25) J2(0.75,-2.75) J3(0.75,-2.25) J5(0.75,-1.25) J10(0.75,1.25) J12(0.75,2.25) J13(0.75,2.75) J14(0.75,3.25) K1(1.25,-3.25) K2(1.25,-2.75) K3(1.25,-2.25) K5(1.25,-1.25) K6(1.25,-0.75) K7(1.25,-0.25) K8(1.25,0.25) K9(1.25,0.75) K10(1.25,1.25) K12(1.25,2.25) K13(1.25,2.75) K14(1.25,3.25) L1(1.75,-3.25) L2(1.75,-2.75) L3(1.75,-2.25) L12(1.75,2.25) L13(1.75,2.75) L14(1.75,3.25) M1(2.25,-3.25) M2(2.25,-2.75) M3(2.25,-2.25) M4(2.25,-1.75) M5(2.25,-1.25) M6(2.25,-0.75) M7(2.25,-0.25) M8(2.25,0.25) M9(2.25,0.75) M10(2.25,1.25) M11(2.25,1.75) M12(2.25,2.25) M13(2.25,2.75) M14(2.25,3.25) N1(2.75,-3.25) N2(2.75,-2.75) N3(2.75,-2.25) N4(2.75,-1.75) N5(2.75,-1.25) N6(2.75,-0.75) N7(2.75,-0.25) N8(2.75,0.25) N9(2.75,0.75) N10(2.75,1.25) N11(2.75,1.75) N12(2.75,2.25) N13(2.75,2.75) N14(2.75,3.25) P1(3.25,-3.25) P2(3.25,-2.75) P3(3.25,-2.25) P4(3.25,-1.75) P5(3.25,-1.25) P6(3.25,-0.75) P7(3.25,-0.25) P8(3.25,0.25) P9(3.25,0.75) P10(3.25,1.25) P11(3.25,1.75) P12(3.25,2.25) P13(3.25,2.75) P14(3.25,3.25)
  silkscreen extent -6.78,-6.02 6.63,5.87, body extent -6.55,-5.8 6.55,5.8, height 1
ICC_VFBGA96_9x13_P080 [mm]
  round 0.4 smd mask+0.05: A1(-3.2,6) A2(-2.4,6) A3(-1.6,6) A7(1.6,6) A8(2.4,6) A9(3.2,6) B1(-3.2,5.2) B2(-2.4,5.2) B3(-1.6,5.2) B7(1.6,5.2) B8(2.4,5.2) B9(3.2,5.2) C1(-3.2,4.4) C2(-2.4,4.4) C3(-1.6,4.4) C7(1.6,4.4) C8(2.4,4.4) C9(3.2,4.4) D1(-3.2,3.6) D2(-2.4,3.6) D3(-1.6,3.6) D7(1.6,3.6) D8(2.4,3.6) D9(3.2,3.6) E1(-3.2,2.8) E2(-2.4,2.8) E3(-1.6,2.8) E7(1.6,2.8) E8(2.4,2.8) E9(3.2,2.8) F1(-3.2,2) F2(-2.4,2) F3(-1.6,2) F7(1.6,2) F8(2.4,2) F9(3.2,2) G1(-3.2,1.2) G2(-2.4,1.2) G3(-1.6,1.2) G7(1.6,1.2) G8(2.4,1.2) G9(3.2,1.2) H1(-3.2,0.4) H2(-2.4,0.4) H3(-1.6,0.4) H7(1.6,0.4) H8(2.4,0.4) H9(3.2,0.4) J1(-3.2,-0.4) J2(-2.4,-0.4) J3(-1.6,-0.4) J7(1.6,-0.4) J8(2.4,-0.4) J9(3.2,-0.4) K1(-3.2,-1.2) K2(-2.4,-1.2) K3(-1.6,-1.2) K7(1.6,-1.2) K8(2.4,-1.2) K9(3.2,-1.2) L1(-3.2,-2) L2(-2.4,-2) L3(-1.6,-2) L7(1.6,-2) L8(2.4,-2) L9(3.2,-2) M1(-3.2,-2.8) M2(-2.4,-2.8) M3(-1.6,-2.8) M7(1.6,-2.8) M8(2.4,-2.8) M9(3.2,-2.8) N1(-3.2,-3.6) N2(-2.4,-3.6) N3(-1.6,-3.6) N7(1.6,-3.6) N8(2.4,-3.6) N9(3.2,-3.6) P1(-3.2,-4.4) P2(-2.4,-4.4) P3(-1.6,-4.4) P7(1.6,-4.4) P8(2.4,-4.4) P9(3.2,-4.4) R1(-3.2,-5.2) R2(-2.4,-5.2) R3(-1.6,-5.2) R7(1.6,-5.2) R8(2.4,-5.2) R9(3.2,-5.2) T1(-3.2,-6) T2(-2.4,-6) T3(-1.6,-6) T7(1.6,-6) T8(2.4,-6) T9(3.2,-6)
  silkscreen extent -4.72,-6.55 4.55,6.73, body extent -4.55,-6.55 4.55,6.55, height 1
ICC_WFQFN44-EPAD_5X6_P040 [mm]
  rect 0.8x0.2 smd mask+0.05: 1(-2.45,2.2) 2(-2.45,1.8) 3(-2.45,1.4) 4(-2.45,1) 5(-2.45,0.6) 6(-2.45,0.2) 7(-2.45,-0.2) 8(-2.45,-0.6) 9(-2.45,-1) 10(-2.45,-1.4) 11(-2.45,-1.8) 12(-2.45,-2.2) 23(2.45,-2.2) 24(2.45,-1.8) 25(2.45,-1.4) 26(2.45,-1) 27(2.45,-0.6) 28(2.45,-0.2) 29(2.45,0.2) 30(2.45,0.6) 31(2.45,1) 32(2.45,1.4) 33(2.45,1.8) 34(2.45,2.2)
  rect 0.2x0.8 smd mask+0.05: 13(-1.8,-2.95) 14(-1.4,-2.95) 15(-1,-2.95) 16(-0.6,-2.95) 17(-0.2,-2.95) 18(0.2,-2.95) 19(0.6,-2.95) 20(1,-2.95) 21(1.4,-2.95) 22(1.8,-2.95) 35(1.8,2.95) 36(1.4,2.95) 37(1,2.95) 38(0.6,2.95) 39(0.2,2.95) 40(-0.2,2.95) 41(-0.6,2.95) 42(-1,2.95) 43(-1.4,2.95) 44(-1.8,2.95)
  rect 3.6x4.6 smd paste-1.8 mask+0.05: ep(0,0)
  silkscreen extent -2.5,-3 2.5,3, body extent -2.5,-3 2.5,3, height 0.81
IND_MURATA_DFE201612P [mm] "MCD-01491"
  rect 0.8x1.8 smd far side mask+0.05: 1(-0.8,0) 2(0.8,0)
  body extent -1.1,-0.9 1.1,0.9, height 1.2
L0603_H0P8 [mm]
  rect 0.8x0.95 smd mask+0.05: 1(-0.8,0) 2(0.8,0)
  silkscreen extent -1.33,-0.6 1.33,0.6, body extent -0.87,-0.47 0.87,0.47, height 0.9
R0402#1 [mm]
  rect 0.51x0.7 smd mask+0.05: 1(-0.45,0) 2(0.45,0)
  silkscreen extent -0.72,-0.43 0.72,0.43, body extent -0.52,-0.3 0.52,0.3, height 0.4
R0402#2 [mm]
  rect 0.51x0.7 smd far side mask+0.05: 1(-0.45,0) 2(0.45,0)
  body extent -0.52,-0.3 0.52,0.3, height 0.4
SWI_JIUBABA_C-TS-02H-2-5-B-V-T_R_BLUE [mm] "BLUE"
  rect 0.75x1 smd mask+0.05: 1(-2.225,0.75) 2(2.225,0.75) 3(-2.225,-0.75) 4(2.225,-0.75)
  silkscreen extent -1.85,-1.6 1.85,1.6, body extent -2.45,-1.6 2.45,1.6, height 2.6

## Part data
B1: library part MCD-00172, "Switch HW SMD blue", Manufacturer=JIUBABA, Manufacturer_Part_Number="C-TS-02H-2.5-B-V-T/R BLUE", ComponentLink1Description=Datasheet, ComponentLink1URL=http://tunmcdsvn.tun.st.com/Component_Datasheet_Library/Trunk/Misc/Jiubaba_TS-02H-H2-5, ECCN_EU=n/a, ECCN_US=n/a, Internal_Part_Number=MCD-00172, Part_Type=Misc, Provided_By=SUBCO, Status=Checked
C1 C2 C3 C4 C5 C6 C7 C8 C9 C10 C11 C12 C17 C19 C20 C21 C22 C23 C24 C25 C26 C27 C28 C61 C64 C66 C71 C72 C73 C74 C78 C80 C82: library part MCD-00006, "Capacitor, MLCC, 100nF, 16V, X7R, 10%, 0402, T=0.5mm", Alternate_Manufacturer=MURATA, Alternate_Manufacturer_Part_Number=GCM155R71C104KA55D, Manufacturer=YAGEO, Manufacturer_Part_Number=CC0402KRX7R7BB104, Package=C0402, ComponentLink1Description=Datasheet, ComponentLink1URL=http://tunmcdsvn.tun.st.com/Component_Datasheet_Library/Trunk/Capacitors/Yageo_Multilayer_Capacitor_X7R_series_100pF_to_22uF, ECCN_EU=NEC, ECCN_US=EAR99, Internal_Part_Number=MCD-00006, Part_Type=Capacitor, Provided_By=SUBCO, Status=Released
C13 C14 C30 C32 C35 C36 C37 C41 C45 C47 C48 C50 C53 C55 C56 C58 C59 C60 C65 C70 C75 C76 C77 C84 C85 C86 C87 C88 C89 C90 C91 C92 C93 C94 C95 C96 C97: library part MCD-00095, "Capacitor, MLCC, 1uF, 6V3, X5R, 10%, 0402, T=0,5mm", Alternate_Manufacturer=MURATA, Alternate_Manufacturer_Part_Number=GRM155R60J105KE19, Manufacturer_Part_Number=GRM155R61E105KA12, Package=C0402, ComponentLink1Description=Datasheet, ComponentLink1URL=http://tunmcdsvn.tun.st.com/Component_Datasheet_Library/Trunk/Capacitors/Murata_Capacitor_GR_series, ECCN_EU=NEC, ECCN_US=EAR99, Internal_Part_Number=MCD-00095, Manufacturer=MURATA, Part_Type=Capacitor, Provided_By=SUBCO, Status=Released
C15 C16 C18 C31 C33 C39 C42 C46: library part MCD-00099, "Capacitor, MLCC, 10uF, 10V, X5R, 10%, 0603, T=0,8mm", Manufacturer=MURATA, Manufacturer_Part_Number=GRM188R61A106KE69D, Package=C0603, ComponentLink1Description=Datasheet, ComponentLink1URL=http://tunmcdsvn.tun.st.com/Component_Datasheet_Library/Trunk/Capacitors/Murata_Capacitor_GR_series, ECCN_EU=NEC, ECCN_US=EAR99, Internal_Part_Number=MCD-00099, Part_Type=Capacitor, Provided_By=SUBCO, Status=Released
C29 C34 C38 C40 C62 C63: library part MCD-00100, "Capacitor, MLCC, 22uF, 6V3, X5R, 20%, 0603, T=0,8mm", Manufacturer=MURATA, Manufacturer_Part_Number=GRM188R60J226MEA0J, Package=C0603, ComponentLink1Description=Datasheet, ComponentLink1URL=http://tunmcdsvn.tun.st.com/Component_Datasheet_Library/Trunk/Capacitors/Murata_Capacitor_GR_series, ECCN_EU=NEC, ECCN_US=EAR99, Internal_Part_Number=MCD-00100, Part_Type=Capacitor, Provided_By=SUBCO, Status=Released
C43 C49 C51 C52: library part MCD-01356, "Capacitor, MLCC, 4.7uF, 6V3, X5R, 20%, 0402, T=0,5mm", Manufacturer=MURATA, Manufacturer_Part_Number=GRM155R60J475ME47, Package=C0402, ComponentLink1Description=Datasheet, ComponentLink1URL=http://tunmcdsvn.tun.st.com/Component_Datasheet_Library/Trunk/Capacitors/Murata_Capacitor_GR_series, ECCN_EU=NEC, ECCN_US=EAR99, Internal_Part_Number=MCD-01356, Part_Type=Capacitor, Provided_By=SUBCO, Status=Released
C44: library part MCD-00011, "Capacitor, MLCC, 10nF, 16V, X7R, 10%, 0402, T=0.5mm", Manufacturer=YAGEO, Manufacturer_Part_Number=CC0402KRX7R7BB103, Package=C0402, ComponentLink1Description=Datasheet, ComponentLink1URL=http://tunmcdsvn.tun.st.com/Component_Datasheet_Library/Trunk/Capacitors/Yageo_Multilayer_Capacitor_X7R_series_100pF_to_22uF, ECCN_EU=NEC, ECCN_US=EAR99, Internal_Part_Number=MCD-00011, Part_Type=Capacitor, Provided_By=SUBCO, Status=Released
C54 C57: library part MCD-00198, "Capacitor, MLCC, 1nF, 16V, X7R, 10%, 0402, T=0.5mm", Manufacturer=YAGEO, Manufacturer_Part_Number=CC0402KRX7R7BB102, Package=C0402, ComponentLink1Description=Datasheet, ComponentLink1URL=http://tunmcdsvn.tun.st.com/Component_Datasheet_Library/Trunk/Capacitors/Yageo_Multilayer_Capacitor_X7R_series_100pF_to_22uF, ECCN_EU=NEC, ECCN_US=EAR99, Internal_Part_Number=MCD-00198, Part_Type=Capacitor, Provided_By=SUBCO, Status=Released
C67 C68 C69: library part MCD-01823, "Capacitor,MLCC,2.2uF,6V3,X5R,10%,0402,T=0.5", Manufacturer=MURATA, Manufacturer_Part_Number=GRM155R60J225KE95D, Package=C0402, ComponentLink1Description=Datasheet, ComponentLink1URL=http://tunmcdsvn.tun.st.com/Component_Datasheet_Library/Trunk/Capacitors/Murata_Capacitor_GR_series, ECCN_EU=NEC, ECCN_US=EAR99, Internal_Part_Number=MCD-01823, Part_Type=Capacitor, Provided_By=SUBCO, Status=Checked
C79 C81 C83: library part MCD-00012, "Capacitor, MLCC, 2.2uF, 10V, X5R, 10%, 0603, T=0,8mm", Alternate_Manufacturer=KEMET, Alternate_Manufacturer_Part_Number=C0603C225K8PACTU, Manufacturer=YAGEO, Manufacturer_Part_Number=CC0603KRX5R6BB225, Package=C0603, ComponentLink1Description=Datasheet, ComponentLink1URL=http://tunmcdsvn.tun.st.com/Component_Datasheet_Library/Trunk/Capacitors/Yageo_Multilayer_capacitor_X5R_series_100pF_to_100uF, ECCN_EU=NEC, ECCN_US=EAR99, Internal_Part_Number=MCD-00012, Part_Type=Capacitor, Provided_By=SUBCO, Status=Released
L1 L2 L3 L4: library part MCD-01491, "Inductors 1.0uH 54mOhms3.3A +/-20% 2016", Manufacturer=MURATA, Manufacturer_Part_Number=DFE201612P-1R0M, Package=2016, ComponentLink1Description=Datasheet, ComponentLink1URL=http://tunmcdsvn.tun.st.com/Component_Datasheet_Library/Trunk/Inductors/Murata_Inductor_DFE201612P-1ROM/Murata_inductor_DFE201612P-1R0M.pdf, ECCN_EU=n/a, ECCN_US=n/a, Internal_Part_Number=MCD-01491, Part_Type=Inductor, Provided_By=SUBCO, Status="Footprint available"
L5: library part MCD-01134, "IND 4.7uH 20% 80mA 600mhom 0603", Manufacturer=MURATA, Manufacturer_Part_Number=LQM18FN4R7M00D, Package=0603, ComponentLink1Description=Datasheet, ComponentLink1URL=http://tunmcdsvn.tun.st.com/Component_Datasheet_Library/Trunk/Inductors/Murata_inductor_LQM18FN4R7M00D, ECCN_EU=n/a, ECCN_US=n/a, Internal_Part_Number=MCD-01134, Part_Type=Inductor, Provided_By=SUBCO, Status="Footprint available"
R1 R2 R3 R4 R5 R6 R7 R8 R9 R10 R11 R12 R13 R14 R15 R16 R17 R18 R19 R20 R21 R22 R23 R24 R25: library part MCD-00118, "Resistor,56R,0402,1%,1/16W", Manufacturer=YAGEO, Manufacturer_Part_Number=RC0402FR-0756RL, Package=R0402, ComponentLink1Description=Datasheet, ComponentLink1URL=http://tunmcdsvn.tun.st.com/Component_Datasheet_Library/Trunk/Resistors/Yageo_Resistor_RC0402-series, ECCN_EU=NEC, ECCN_US=EAR99, Internal_Part_Number=MCD-00118, Part_Type=Resistor, Provided_By=SUBCO, Status=Released
R26 R27: library part MCD-00120, "Resistor,240R,0402,1%,1/16W", Manufacturer=YAGEO, Manufacturer_Part_Number=RC0402FR-07240RL, Package=R0402, ComponentLink1Description=Datasheet, ComponentLink1URL=http://tunmcdsvn.tun.st.com/Component_Datasheet_Library/Trunk/Resistors/Yageo_Resistor_RC0402-series, ECCN_EU=NEC, ECCN_US=EAR99, Internal_Part_Number=MCD-00120, Part_Type=Resistor, Provided_By=SUBCO, Status=Released
R28: library part MCD-00119, "Resistor,100R,0402,1%,1/16W", Manufacturer=YAGEO, Manufacturer_Part_Number=RC0402FR-07100RL, Package=R0402, ComponentLink1Description=Datasheet, ComponentLink1URL=http://tunmcdsvn.tun.st.com/Component_Datasheet_Library/Trunk/Resistors/Yageo_Resistor_RC0402-series, ECCN_EU=NEC, ECCN_US=EAR99, Internal_Part_Number=MCD-00119, Part_Type=Resistor, Provided_By=SUBCO, Status=Released
R29 R30 R40: library part MCD-00053, "Resistor,10K,0402,1%,1/16W", Manufacturer=YAGEO, Manufacturer_Part_Number=RC0402FR-0710KL, Package=R0402, ComponentLink1Description=Datasheet, ComponentLink1URL=http://tunmcdsvn.tun.st.com/Component_Datasheet_Library/Trunk/Resistors/Yageo_Resistor_RC0402-series, ECCN_EU=NEC, ECCN_US=EAR99, Internal_Part_Number=MCD-00053, Part_Type=Resistor, Provided_By=SUBCO, Status=Released
R37 R38: library part MCD-00068, "Resistor,1K5,0402,1%,1/16W", Manufacturer=YAGEO, Manufacturer_Part_Number=RC0402FR-071K5L, Package=R0402, ComponentLink1Description=Datasheet, ComponentLink1URL=http://tunmcdsvn.tun.st.com/Component_Datasheet_Library/Trunk/Resistors/Yageo_Resistor_RC0402-series, ECCN_EU=NEC, ECCN_US=EAR99, Internal_Part_Number=MCD-00068, Part_Type=Resistor, Provided_By=SUBCO, Status=Released
R39 R41 R42: library part MCD-00052, "Resistor,0R,0402,5%,1/16W", Manufacturer=YAGEO, Manufacturer_Part_Number=RC0402JR-070RL, Package=R0402, ComponentLink1Description=Datasheet, ComponentLink1URL=http://tunmcdsvn.tun.st.com/Component_Datasheet_Library/Trunk/Resistors/Yageo_Resistor_RC0402-series, ECCN_EU=NEC, ECCN_US=EAR99, Internal_Part_Number=MCD-00052, Part_Type=Resistor, Provided_By=SUBCO, Status=Released
R43: library part MCD-00063, "Resistor,47K,0402,1%,1/16W", Manufacturer=YAGEO, Manufacturer_Part_Number=RC0402FR-0747KL, Package=R0402, ComponentLink1Description=Datasheet, ComponentLink1URL=http://tunmcdsvn.tun.st.com/Component_Datasheet_Library/Trunk/Resistors/Yageo_Resistor_RC0402-series, ECCN_EU=NEC, ECCN_US=EAR99, Internal_Part_Number=MCD-00063, Part_Type=Resistor, Provided_By=SUBCO, Status=Released
U1: library part MCD-01805, "MPU LFBGA 16x16x1.271 PITCH 0.8 mm secure boot + crypto", Manufacturer=STMICROELECTRONICS, Package=LFBGA, California_Proposition_65=N/A, CCATS="G179243   5A992C 740.17(B)(3) 25-Mar-2019", Company_Nationality=Netherlands, Component_Country_Of_Origin="Korea (South)", ComponentLink1Description=Datasheet, ComponentLink1URL=http://tunmcdsvn.tun.st.com/Component_Datasheet_Library/Trunk/IC/STM_MPU_STM32MP157C/stm32mp157c.pdf, ECCN_EU=5A002A4, ECCN_US=5A992C, Export_Juridiction=EU, Internal_Part_Number=MCD-01805, Manufacturer_Part_Number=STM32MP157CAB3, Part_Type=IC, Provided_By="SUBCO with ST control", Status=Released
U2: library part MCD-01811, "Memory,DDR3L,4Gb,256Mbx16,933Mhz,1V35,TFBGA", Manufacturer=NANYA, Manufacturer_Part_Number=NT5CC256M16ER-EK, ComponentLink1Description=Datasheet, ComponentLink1URL=http://tunmcdsvn.tun.st.com/Component_Datasheet_Library/Trunk/IC/Nanya_DDR3_NT5CC256M16ER-EK, ECCN_EU=tbd, ECCN_US=tbd, Internal_Part_Number=MCD-01811, Part_Type=IC, Provided_By=SUBCO, Status=Released
U4: library part MCD-01650, "ST PMIC:  4 step-down + 1 advanced boost SMPS, 6 LDOs, 2 pwr switches, DDR Vref, NVM option 'A' for IO@3.3V", Manufacturer=STMICROELECTRONICS, Manufacturer_Part_Number=STPMIC1APQR, Package="WFQFN 5.0x6.0x0.80mm", ComponentLink1Description=Datasheet, ComponentLink1URL=http://tunmcdsvn.tun.st.com/Component_Datasheet_Library/Trunk/IC/STM_PMIC_LuftBurg_5x6_44L_20_01_2016, ECCN_EU=NEC, ECCN_US=EAR99, Internal_Part_Number=MCD-01650, Part_Type=IC, Provided_By="SUBCO with ST control", Status="Footprint available"
U5: library part MCD-00110, "Memory,e-MMC,4GB,3V3,WFBGA,153pins", Manufacturer=TOSHIBA, Manufacturer_Part_Number=THGBMDG5D1LBAIL, ComponentLink1Description=Datasheet, ComponentLink1URL=http://tunmcdsvn.tun.st.com/Component_Datasheet_Library/Trunk/IC/Toshiba_eMMC_THGBMDG5D1LBAIL_20151201, ECCN_EU=NEC, ECCN_US=3A991, Internal_Part_Number=MCD-00110, Part_Type=IC, Provided_By=SUBCO, Status=Released

## Via types
v1: diameter 0.4, hole 0.2, Top Layer to Bottom Layer, tented both sides, 309 vias
v2: diameter 0.6, hole 0.3, Top Layer to Bottom Layer, tented both sides, 61 vias
v3: diameter 0.4, hole 0.2, Top Layer to Signal Layer 1, tented top, 2 vias

## Nets (pads, with @x,y where several pads share a name; then routed paths per layer and width w, separated by ;. In a path a pad name is that pad's centre, name@x,y a point inside that pad or via, vN(x,y) a via of type N, cw(c..) or ccw(c..) an arc to the next point about the centre after c; other vN are vias at no path point)
3V3: C32.2 C40.2 C78.2 C79.2 L4.2 U4.22 U4.27 U5.E6 U5.F5 U5.J10 U5.K9 | length 48.6
  Top Layer w0.175: U5.J10@27.15,88.475 U5.K9@27.65,88.975 v1(27.65,89.45) ; U5.E6@29.15,86.475 U5.F5@29.65,86.975 v1(30.075,86.975)
  Top Layer w0.2: 9.5,82.85 9.85,83.2 U4.22@10.05,83.2 ; v1(12.2,81.25) 12.2,81.85 12.4,82.05 U4.27@12.4,82.55
  Top Layer w0.3: C32.2@7.1,80.5 v1(7.1,80.85) 7.1,81.45 7.5,81.85 8.5,81.85 9.5,82.85
  Top Layer w0.5: C40.2@10.125,77.55 v1(10.8,77.55)
  Top Layer w0.6: C40.2@10.125,77.55 L4.2@10.125,78.75
  Signal Layer 2 w0.3: v1(7.1,80.85) 10.4,77.55 v1(10.8,77.55)
  Bottom Layer w0.1: C79.2@26.8,89.575 C79.2@26.925,89.45 ; v1@30,87.05 v1(30.075,86.975)
  Bottom Layer w0.3: v1(12.2,81.25) 11.525,80.575 11.525,77.75 11.325,77.55 v1(10.8,77.55) 10.8,81 11.925,82.125 15.05,82.125 15.625,81.55 19.525,81.55 21.7,83.725 22.075,83.725 23.625,85.275 23.625,86.4 C79.2@26.8,89.575 ; C79.2@26.925,89.45 v1(27.65,89.45) 28.1,89.45 C78.2@30,87.55 v1@30,87.05
5V_VIN: C18.2 C31.2 C33.2 C39.2 C41.2 C51.1 R43.2 U4.8 U4.12 U4.19 U4.24 U4.28 U4.36 U4.37 | length 15.1
  Top Layer w0.09: v1(12.8,81.15) U4.28@12.8,82.55
  Top Layer w0.12: R43.2@18.25,81.95 R43.2@18.3,82
  Top Layer w0.2: C39.2@9.3,80.45 9.525,80.675 9.525,80.875 10.1,81.45 10.6,81.45 11.2,82.05 U4.24@11.2,82.55 ; 9.35,84.4 U4.19@10.05,84.4 ; C31.2@12.4,80.45 12.8,80.85 v1(12.8,81.15) ; U4.8@12.4,87.45 12.4,88.85 v1(12.2,89.05) 12.2,89.55 C33.2@12.4,89.75 ; U4.36@15.95,83.6 16.625,83.6 v1(16.8,83.775) ; U4.37@15.95,84 16.575,84 v1(16.8,83.775) ; R43.2@18.3,82 C51.1@18.3,82.75 18.225,82.825 v1(17.75,82.825) v1(16.8,83.775)
  Top Layer w0.3: C41.2@7.65,83.95 v1(8.2,83.95) 8.65,84.4 9.35,84.4
  other v1: 9.1,81.05 9.5,87.85
DDR_A0: R1.1 U1.H18 U2.N3 | length 49.5
  Top Layer w0.12: U1.H18@38.4,64.3 v1(38.8,64.7) ; U2.N3@53.85,64 v1(54.25,64.4)
  Bottom Layer w0.12: v1(38.8,64.7) 39.24,64.7 39.32,64.78 39.32,64.97 39.48,65.13 39.74,65.13 39.96,65.35 39.96,65.749 39.7,66.009 39.7,66.452 39.245,66.907 39.245,67.266 39.7,67.721 39.7,69.358 40.04,69.698 40.04,70.01 39.7,70.35 39.7,70.976 43.799,75.075 44.195,75.075 44.275,74.995 44.725,74.995 44.805,75.075 45.22,75.075 45.3,74.995 45.95,74.995 46.03,75.075 46.575,75.075 46.65,75 47.025,75 47.1,75.075 47.604,75.075 47.834,74.845 48.17,74.845 48.4,75.075 48.63,75.075 48.825,74.88 48.825,71.225 48.55,70.95 48.55,65.35 49.98,63.92 53.11,63.92 53.22,63.81 53.91,63.81 54.25,64.15 v1(54.25,64.4) 54.25,64.65 54.69,65.09 54.69,65.349 54.901,65.56 55.079,65.56 55.569,66.05 56.8,66.05 56.96,65.89 57.48,65.89 57.63,65.74 65.14,65.74 65.21,65.67 R1.1@65.85,65.67
DDR_A1: R2.1 U1.M17 U2.P7 | length 45.4
  Top Layer w0.12: U1.M17@37.6,61.1 v1(38,60.7) ; U2.P7@53.05,60.8 v1(53.45,60.4)
  Bottom Layer w0.12: v1(38,60.7) 38.206,60.7 38.566,61.06 40.516,61.06 40.666,60.91 41.12,60.91 41.38,60.65 41.38,59.99 42.51,58.86 43.225,58.86 43.35,58.985 43.35,59.82 42.722,60.448 42.722,60.643 42.805,60.725 43.057,60.725 43.77,60.012 43.77,57.847 44.097,57.521 44.674,57.521 45.03,57.877 45.03,60.342 45.198,60.51 46.196,60.51 46.29,60.416 46.29,58.096 46.666,57.72 46.99,57.72 47.13,57.58 47.13,55.386 47.268,55.248 ; 47.27,55.25 47.446,55.25 47.546,55.35 47.546,60.346 47.7,60.5 49.1,60.5 49.4,60.8 53.05,60.8 v1(53.45,60.4) 53.741,60.4 54.101,60.04 54.98,60.04 55.06,59.96 55.55,59.96 55.94,59.57 57.41,59.57 57.57,59.41 58.23,59.41 58.551,59.089 58.77,59.089 59.05,58.809 59.05,58.29 60.05,57.29 60.27,57.29 60.73,56.83 R2.1@60.73,56.61
DDR_A2: R3.1 U1.G18 U2.P3 | length 42.7
  Top Layer w0.12: U1.G18@38.4,65.1 v1(38.8,65.5) ; U2.P3@53.05,64 v1(53.45,64.4)
  Bottom Layer w0.12: v1@38.82,65.5 38.82,66.144 38.46,66.504 38.46,67.669 38.86,68.069 38.86,71.324 43.736,76.2 43.95,76.2 44.235,75.915 44.44,75.915 44.725,76.2 44.925,76.2 45.21,75.915 45.415,75.915 45.7,76.2 45.875,76.2 46.16,75.915 46.35,75.915 46.635,76.2 46.842,76.2 47.128,75.915 47.35,75.915 47.635,76.2 47.86,76.2 48.145,75.915 48.365,75.915 48.575,76.125 48.768,76.125 49.575,75.318 49.575,70.9 49.175,70.5 49.175,65.523 50.298,64.4 52.33,64.4 52.373,64.443 v1@53.43,64.443 ; v1(53.45,64.4) 53.45,64.65 53.83,65.03 53.83,65.51 54.29,65.97 54.29,66.34 57.08,69.13 R3.1@57.08,69.45
DDR_A3: R4.1 U1.F19 U2.N2 | length 42
  Top Layer w0.12: U1.F19@39.2,65.9 v1(39.6,65.5) ; U2.N2@53.85,64.8 v1(54.25,65.2)
  Bottom Layer w0.12: v1(39.6,65.5) 39.275,65.5 39.2,65.575 39.2,66.358 38.825,66.733 38.825,67.44 39.28,67.895 39.28,71.15 43.625,75.495 48.804,75.495 49.225,75.074 49.225,71.125 48.85,70.75 48.85,65.45 50.14,64.16 53.181,64.16 53.301,64.04 53.74,64.04 53.84,64.14 53.84,64.701 54.25,65.111 v1(54.25,65.2) 54.25,65.51 54.5,65.76 54.799,65.76 58.11,69.071 R4.1@58.11,69.45